# Altium PCB Watt.PcbDoc
Units mm, origin at the board's own origin, x right, y up, seen from the top; angles counter-clockwise.
Board outline 110 x 115 mm, 2 copper layers (Top Layer, Bottom Layer); 45 components, 38 nets, 166 pads, 9 vias.
Unrouted connection lines stored in the file: 27.
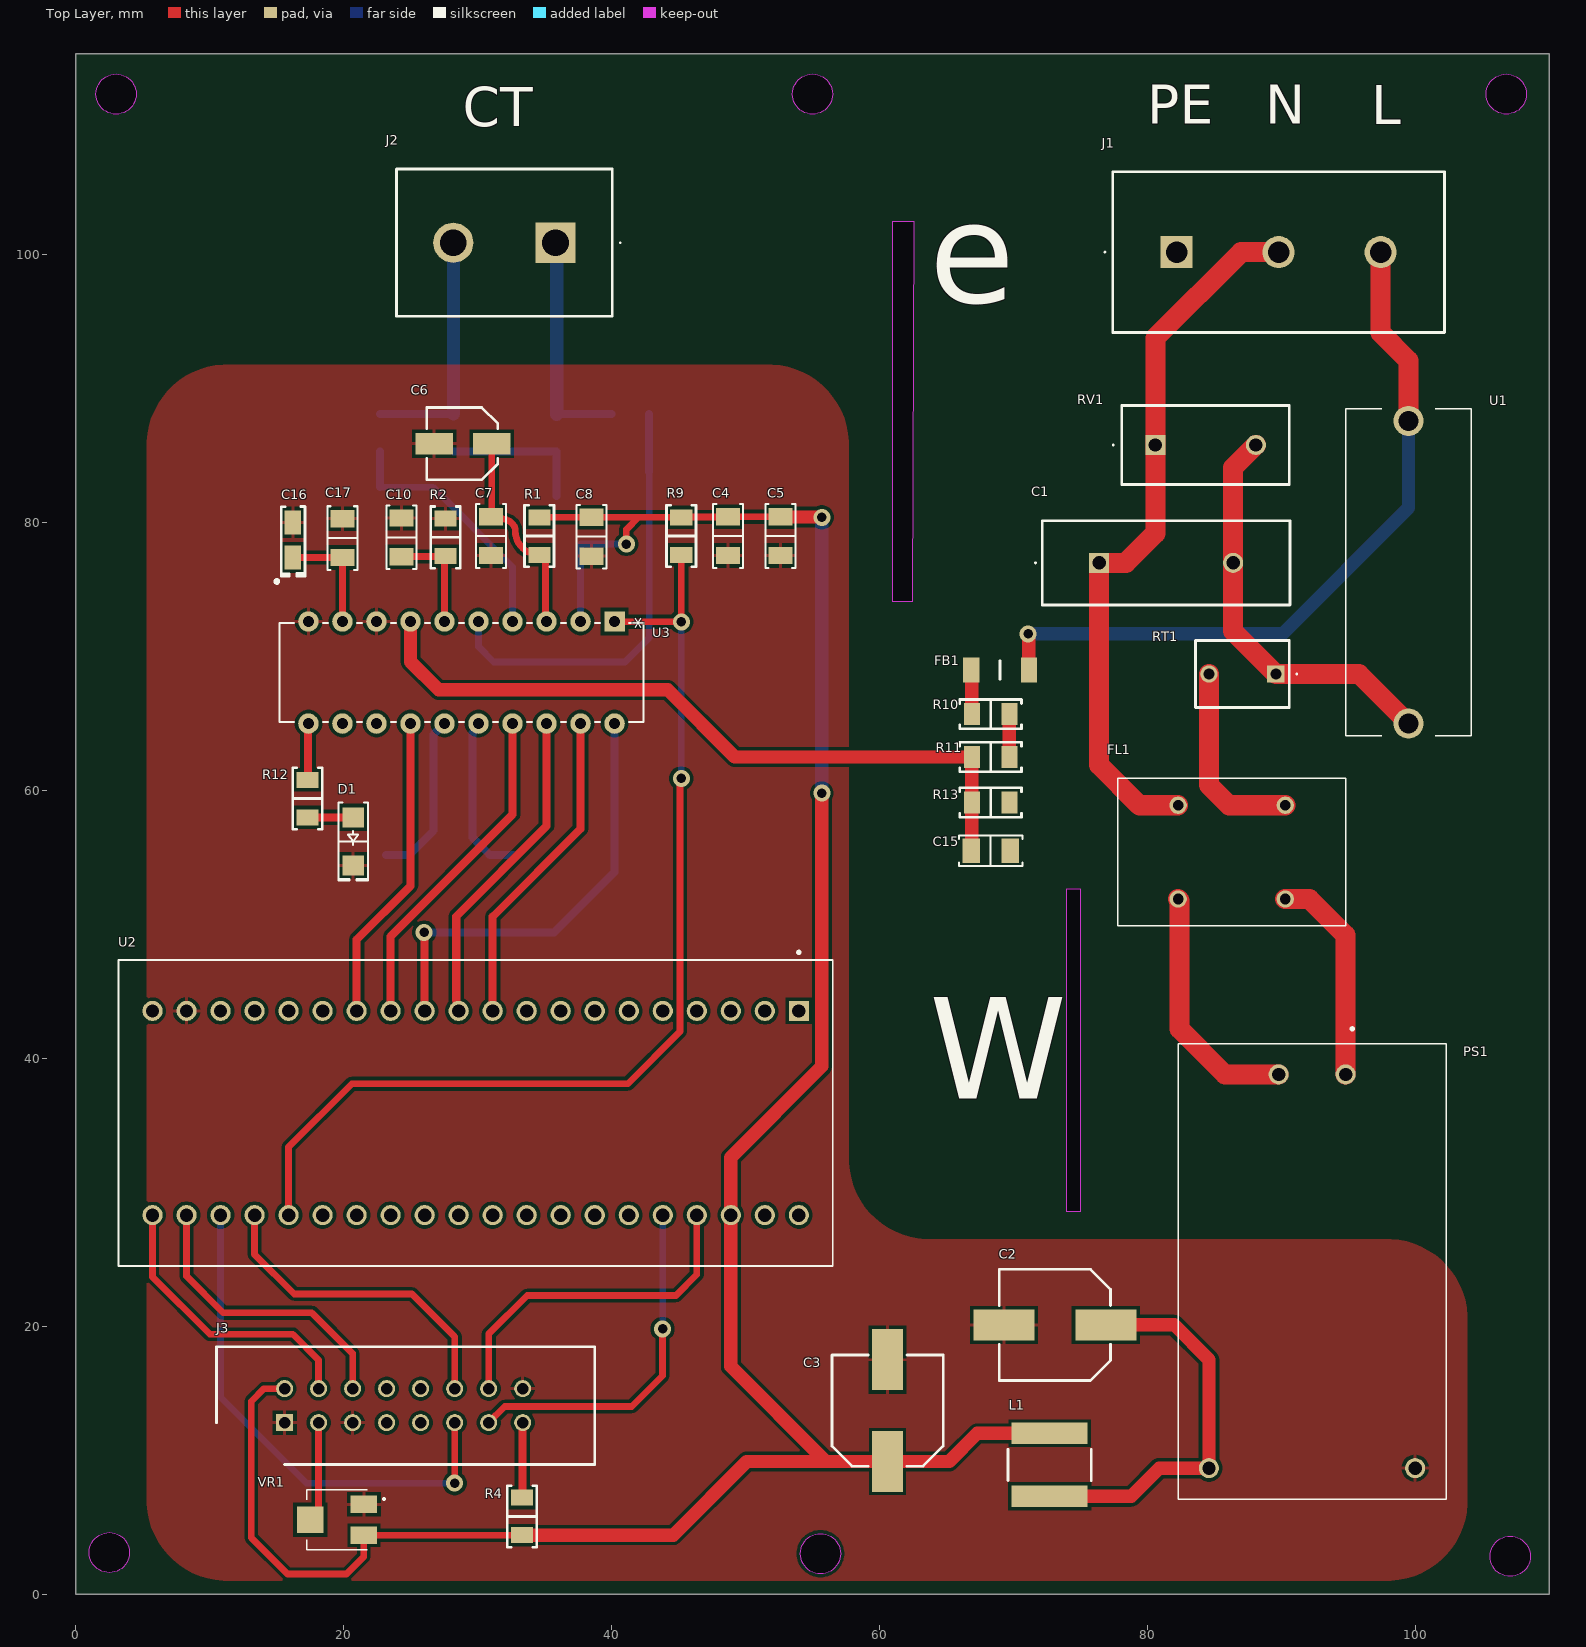
[diagram p0: Top Layer view]
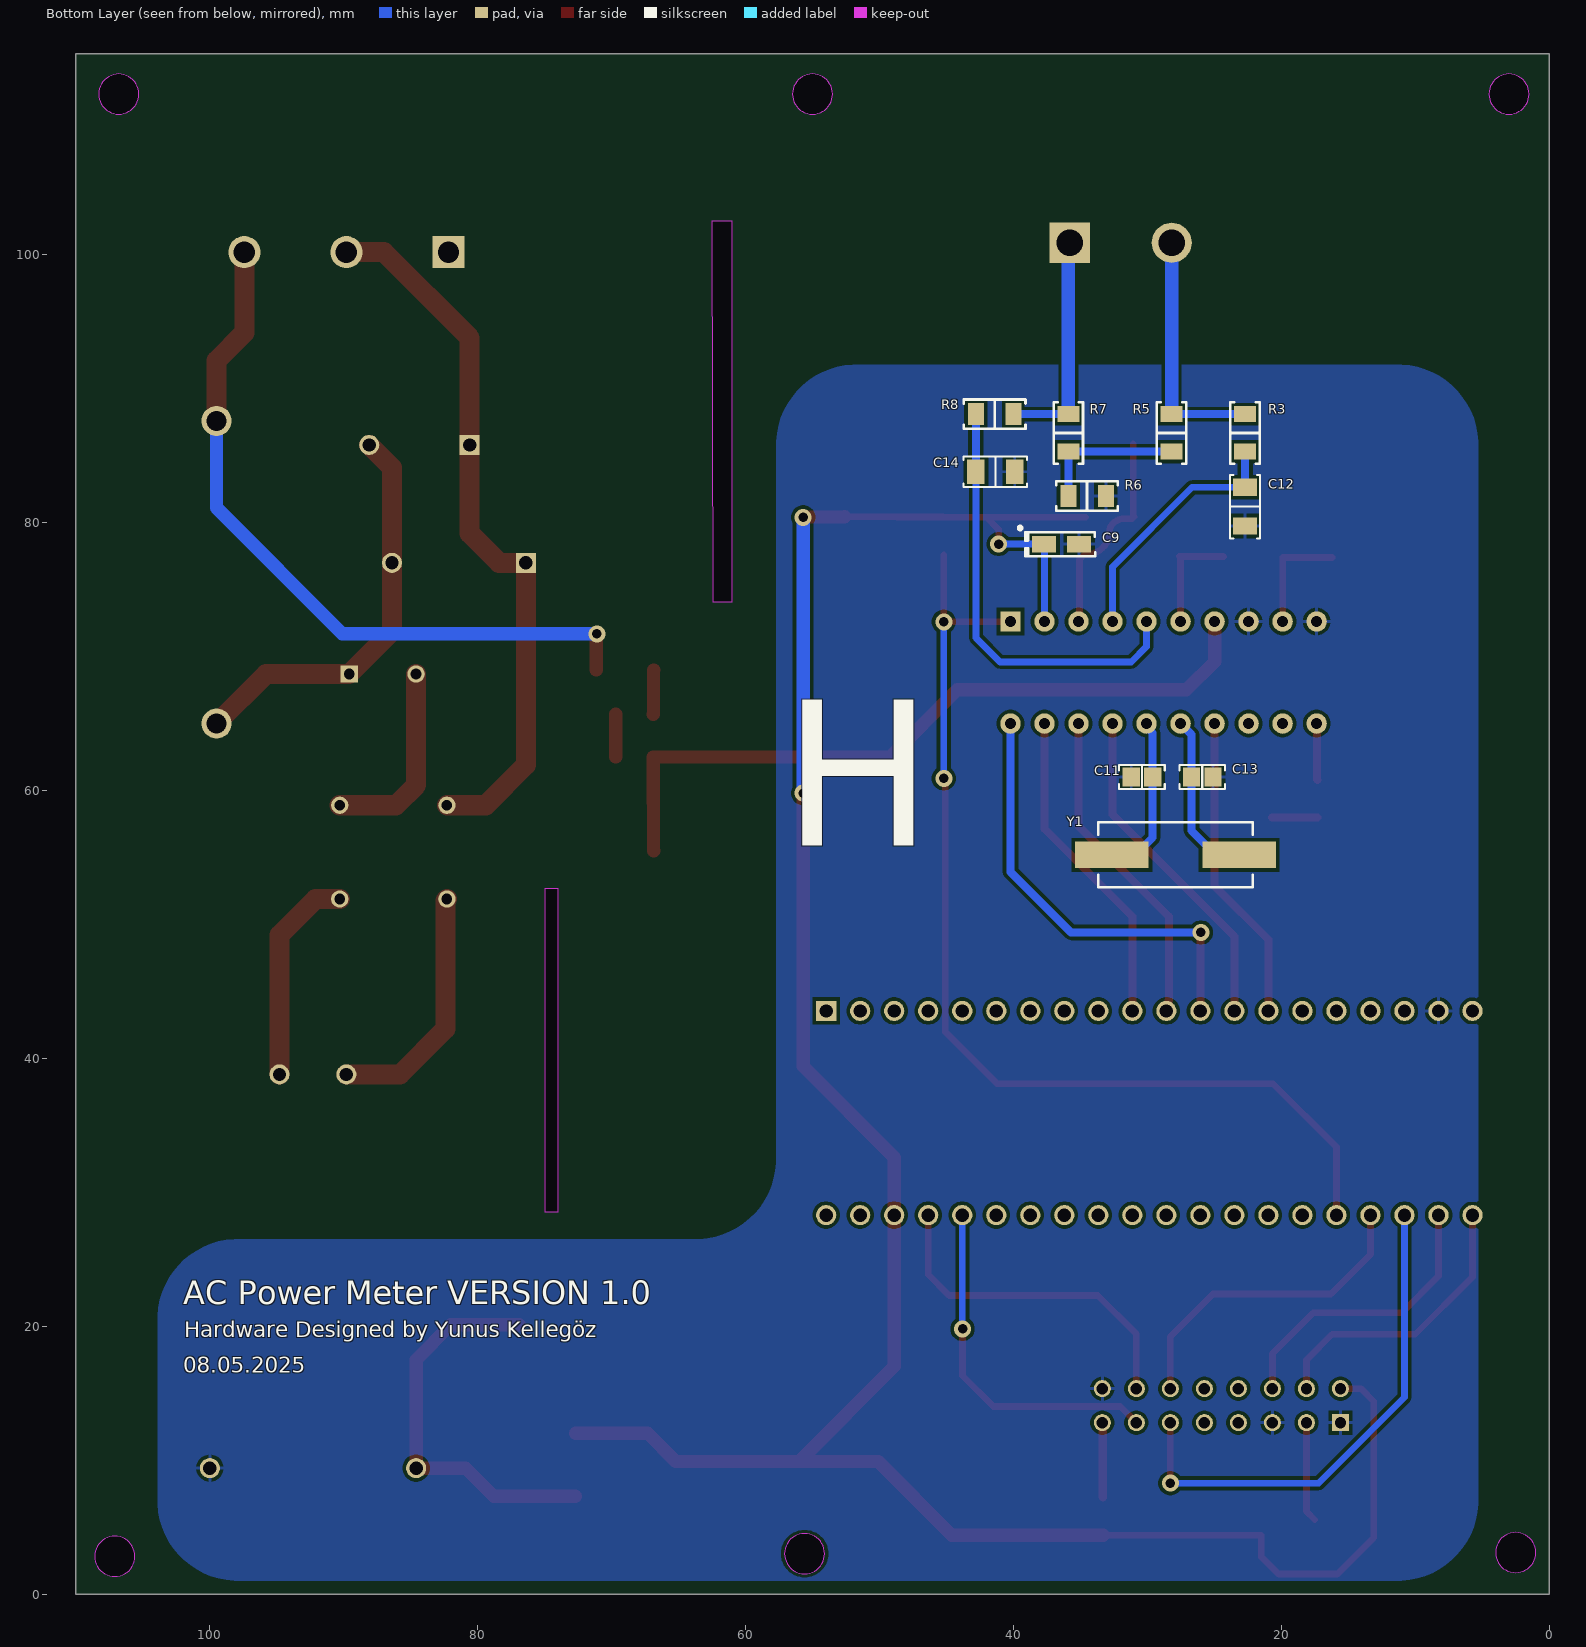
[diagram p1: Bottom Layer view, seen from below]
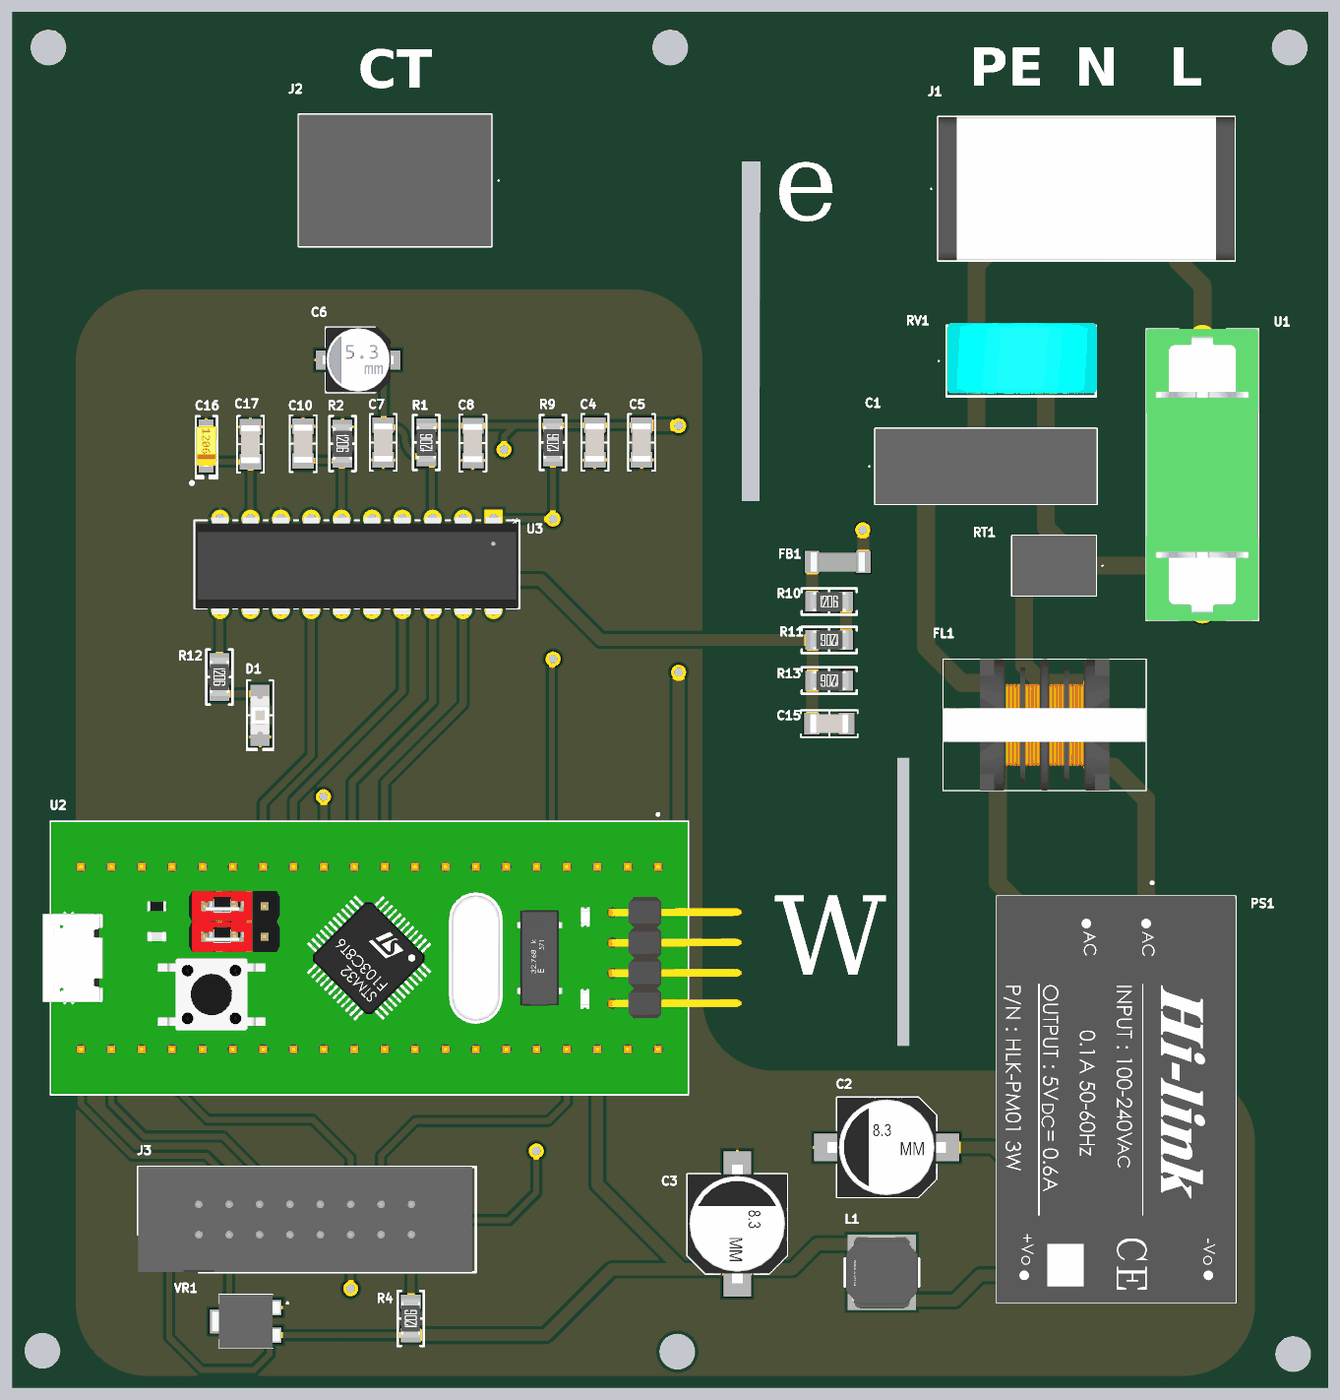
[diagram p2: 3D render of the assembled board from above, using the file's embedded part models]
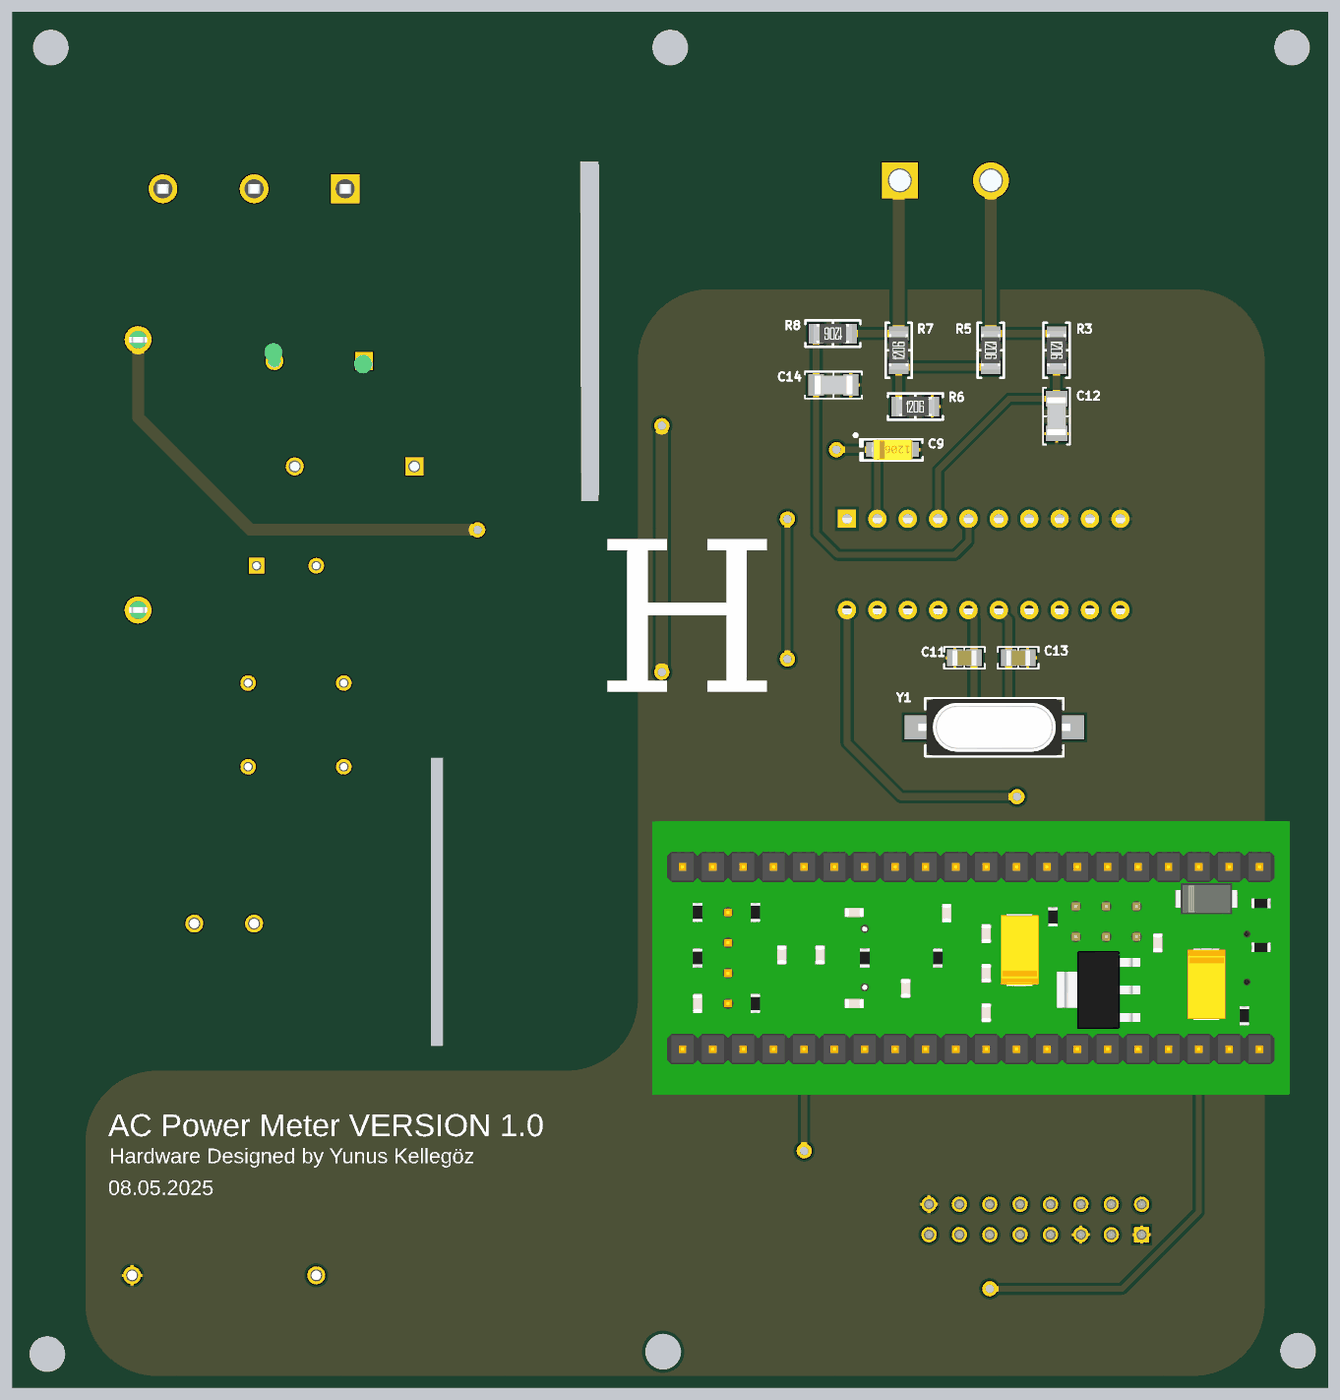
[diagram p3: 3D render of the assembled board from below, using the file's embedded part models]

## Layer stack, top to bottom
Top Solder: solder mask 0.0102, Solder Resist, Dk 3.5
Top Layer: signal copper 0.0356
Dielectric 1: dielectric 0.32, FR-4, Dk 4.8
Bottom Layer: signal copper 0.0356
Bottom Solder: solder mask 0.0102, Solder Resist, Dk 3.5

## Board outline
0,0 110,0 110,115 0,115
cut-out: 106.8,110.5 cw(c106.8,112) 105.3,112 cw(c106.8,112) 106.8,113.5 cw(c106.8,112) 108.3,112 cw(c106.8,112)
cut-out: 55,110.5 cw(c55,112) 53.5,112 cw(c55,112) 55,113.5 cw(c55,112) 56.5,112 cw(c55,112)
cut-out: 107.093,1.319 cw(c107.093,2.819) 105.593,2.819 cw(c107.093,2.819) 107.093,4.319 cw(c107.093,2.819) 108.593,2.819 cw(c107.093,2.819)
cut-out: 55.593,1.519 cw(c55.593,3.019) 54.093,3.019 cw(c55.593,3.019) 55.593,4.519 cw(c55.593,3.019) 57.093,3.019 cw(c55.593,3.019)
cut-out: 2.5,1.6 cw(c2.5,3.1) 1,3.1 cw(c2.5,3.1) 2.5,4.6 cw(c2.5,3.1) 4,3.1 cw(c2.5,3.1)
cut-out: 3,110.5 cw(c3,112) 1.5,112 cw(c3,112) 3,113.5 cw(c3,112) 4.5,112 cw(c3,112)
cut-out: 74,52.65 75,52.65 75,28.55 74,28.55
cut-out: 62.46,74.1 61,74.1 61,102.5 62.54,102.5

## Design rules (kind name [scope] priority, off if disabled: settings)
Clearance [All] p1: gap=0.254 ignorepadtopadclearanceinfootprint=FALSE except(0: Arc-Hole Track-Hole SMDPad-Hole THPad-Hole Via-Hole Fill-Hole Poly-Hole Region-Hole Text-Hole)
HoleSize [All] p1: absolutevalues=TRUE maxlimit=2.54 minlimit=0.2 maxpercent=80.000 minpercent=20.000
PolygonConnect [All] p1: connectstyle=Relief reliefconductorwidth=0.254 reliefentries=4 polygonreliefangle="90 Angle" airgapwidth=0.254
RoutingVias [All] p1: holewidth=0.711 width=1.27 viastyle="Through Hole" minholewidth=0.3 minwidth=0.6 maxholewidth=0.711 maxwidth=1.27
SolderMaskExpansion [All] p1: expansion=0.102 istentingtop=FALSE
Width [All] p1: maxlimit=2 minlimit=0.5 preferedwidth=1 minimp=50.000000 maximp=50.000000 favimp=50.000000
29 further rules are at their usual default settings.

## Components (designator, comment, footprint, x,y, rotation, side; value= is the part's Value field where it differs from the comment)
C1 "100nF 630V" ECQE6104KF3 76.4,77 r0 top
C2 "470 uF-6.3V" "CAP ALSMD 8.3MM H10.5MM" 73.1,20.1 r180 top value="470 µF"
C3 "470 uF-6.3V" "CAP ALSMD 8.3MM H10.5MM" 60.6,13.7 r90 top value="470 µF"
C4 "0.1 µF" "CAP 1206_3216 - 0.8MM" 48.7,79 r90 top
C5 "1µF" "CAP 1206_3216 - 1.0MM" 52.6,79 r90 top
C6 "220 µF" "CAP ALSMD POLY 5.3MM H6.0MM" 28.9,85.9 r180 top
C7 "0.1 µF" "CAP 1206_3216 - 0.8MM" 31,79 r90 top
C8 "0.1 µF" "CAP 1206_3216 - 0.8MM" 38.5,78.95 r90 top
C9 "10µF" "CAP POL 1206_3216" 36.4,78.4 r180 bottom
C10 "0.033 µF" "CAP 1206_3216 - 0.8MM" 24.3,78.9 r270 top
C11 "22 pF" "CAP 0805_2012" 30.4,61 r0 bottom
C12 "0.033 µF" "CAP 1206_3216 - 0.8MM" 22.7,81.2 r90 bottom
C13 "22 pF" "CAP 0805_2012" 25.9,61 r180 bottom
C14 "0.033 µF" "CAP 1206_3216 - 0.8MM" 41.35,83.8 r0 bottom
C15 "0.033 µF" "CAP 1206_3216 - 0.8MM" 68.3,55.5 r180 top
C16 "10µF" "CAP POL 1206_3216" 16.2,78.71 r90 top
C17 "0.1 µF" "CAP 1206_3216 - 0.8MM" 19.9,78.85 r270 top
D1 "Red" "LED 1206_3216 RED" 20.7,56.2 r270 top
FB1 "150 Ohm Ferrite Bead" BEADC4516X185N 69,69 r180 top
FL1 "UU9.8V-103-10mH" SU9VF02100 90.3,58.9 r180 top
J1 "1x3 Klemens" YK3030323000G 82.18,100.2 r0 top
J2 "CT" YK3210203000G 35.8,100.9 r180 top
J3 "2X8 LCD" SHDR16W65P254_2X8_2794X880X900P 15.58,12.8 r0 top
L1 "22uH" FP-NR6028-MFG 72.7,9.65 r90 top
PS1 "HLK-PM01" HLKPM01 94.8,38.8 r270 top
R1 "10 Ohms" "RES 1206_3216" 34.6,79 r90 top
R2 "1 kOhms" "RES 1206_3216" 27.6,78.9 r270 top
R3 "1 kOhms" "RES 1206_3216" 22.7,86.7 r270 bottom
R4 "10 kOhms" "RES 1206_3216" 33.3,5.8 r90 top
R5 "2.2 Ohms" "RES 1206_3216" 28.2,86.7 r270 bottom
R6 "0 Ohms" "RES 1206_3216" 34.5,82 r180 bottom
R7 "2.2 Ohms" "RES 1206_3216" 35.9,86.7 r90 bottom
R8 "1 kOhms" "RES 1206_3216" 41.4,88.1 r0 bottom
R9 "10 kOhms" "RES 1206_3216" 45.2,79 r90 top
R10 "255 kOhms" "RES 1206_3216" 68.3,65.7 r0 top
R11 "255 kOhms" "RES 1206_3216" 68.3,62.5 r180 top
R12 "820 Ohms" "RES 1206_3216" 17.3,59.4 r270 top
R13 "1 kOhms" "RES 1206_3216" 68.3,59.1 r180 top
RT1 "NTC 10D-7 10R" MF72010D5 87.1,68.7 r180 top
RV1 "10D561K" MOV10D561KTR 80.6,85.8 r0 top
U1 "500mA Fuse" 0PTF0078P 99.5,76.3 r270 top
U2 "STM32F103C6T8" MODULE_ZC323000 29.85,35.92 r270 top
U3 "ADE7756AN" N_20_ADI 40.22,72.62 r270 top
VR1 "10K Pot" 3314J2102E 19.5,5.55 r90 top
Y1 "3.579545MHz" "TXC 9C" 27.9,55.2 r0 bottom

## Footprints (in the part's own frame and the unit in brackets; to place one, negate y for a bottom-side part, rotate by r counter-clockwise, add the part's x,y. Pads: shape width x height; smd on the part's side, far side on the other; paste and mask are expansions set on the pad)
0PTF0078P [mm]
  round 2.25 hole 1.5: 1(-11.3,0) 2(11.3,0)
  silkscreen extent -12.2,-4.7 12.2,4.7, body extent -12.2,-4.7 12.2,4.7, height 11.45
3314J2102E [mm]
  rect 1.3x2 smd: 1(1.15,-2) 3(-1.15,-2)
  rect 2x2 smd: 2(0,2)
  silkscreen extent -2.25,-3.55 2.25,2.25, body extent -2.25,-2.87 2.25,2.8, height 2.65
BEADC4516X185N [mm]
  rect 1.2x1.85 smd: 1(-2.15,0) 2(2.15,0)
  silkscreen extent 0,-0.7 0,0.7, body extent -2.25,-0.8 2.25,0.8, height 1.85
"CAP 0805_2012" [mm] "Chip Capacitor, 2-Leads, Body 2.00x1.20mm, IPC Medium Density"
  rect 1.3x1.4 smd: 1(-0.8,0) 2(0.8,0)
  silkscreen extent -1.7,-0.9 1.7,0.9, body extent -1,-0.64 1,0.64, height 1.26
"CAP 1206_3216 - 0.8MM" [mm] "Chip Capacitor, 2-Leads, Body 3.25x1.60mm, IPC Medium Density"
  rect 1.3x1.8 smd: 1(-1.45,0) 2(1.45,0)
  silkscreen extent -2.38,-1.12 2.37,1.12, body extent -1.6,-0.8 1.6,0.8, height 0.8
"CAP 1206_3216 - 1.0MM" [mm] "Chip Capacitor, 2-Leads, Body 3.25x1.60mm, IPC Medium Density"
  rect 1.3x1.8 smd: 1(-1.45,0) 2(1.45,0)
  silkscreen extent -2.38,-1.13 2.37,1.12, body extent -1.6,-0.8 1.6,0.8, height 1
"CAP ALSMD 8.3MM H10.5MM" [mm] "Aluminum Electrolytic Capacitor, Body 8.30x8.30x10.50mm, IPC Low Density"
  rect 4.55x2.3 smd: 1(-3.8,0) 2(3.8,0)
  silkscreen extent -4.15,-4.15 4.15,4.15, body extent -4.95,-4.15 4.95,4.15, height 10.5
"CAP ALSMD POLY 5.3MM H6.0MM" [mm] "Aluminum Polymer Capacitor, Body 5.30x5.30x6.0mm, IPC Medium Density"
  rect 2.8x1.6 smd: 1(-2.15,0) 2(2.15,0)
  silkscreen extent -2.6,-2.7 2.7,2.7, body extent -2.95,-2.7 2.95,2.7, height 6
"CAP POL 1206_3216" [mm] "Molded Capacitor, 2-Leads, Body 3.20x1.6mm, IPC Medium Density"
  rect 1.8x1.23 smd: 1(-1.31,0) 2(1.31,0)
  silkscreen extent -3.22,-0.9 2.5,1.32, body extent -1.72,-0.85 1.71,0.85, height 1.7
ECQE6104KF3 [mm]
  rect 1.5x1.5 hole 1: 1(0,0)
  round 1.5 hole 1: 2(10,0)
  silkscreen extent -4.8,-3.15 14.25,3.15, body extent -4.25,-3.15 14.25,3.15, height 19.1
FP-NR6028-MFG [mm]
  rect 1.6x5.7 smd paste+0 mask+0: 1(-2.35,0) 2(2.35,0)
  silkscreen extent -1.18,-3.1 1.17,3.1, body extent -3.25,-3.2 3.25,3.2, height 0.25
HLKPM01 [mm]
  round 1.5 hole 1: 1(0,0) 2(0,-5) 3(29.4,5.2) 4(29.4,-10.2)
  silkscreen extent -3.5,-12.5 31.7,7.5, body extent -2.3,-12.5 31.7,7.5, height 15.05
"LED 1206_3216 RED" [mm] "Chip Diode, 2-Leads, Body 3.13x1.55mm, IPC Medium Density"
  rect 1.5x1.6 smd: 1(-1.8,0) 2(1.8,0)
  silkscreen extent -2.92,-1.1 2.92,1.1, body extent -1.6,-0.8 1.6,0.8, height 0.9
MF72010D5 [mm]
  rect 1.3x1.3 hole 0.8: 1(-2.5,0)
  round 1.3 hole 0.8: 2(2.5,0)
  silkscreen extent -4.1,-2.5 3.5,2.5, body extent -3.5,-2.5 3.5,2.5, height 11.1
MODULE_ZC323000 [mil]
  rect 59.37x59.37 hole 39.37: 1(-300,950)
  round 59.37 hole 39.37: 2(-300,850) 3(-300,750) 4(-300,650) 5(-300,550) 6(-300,450) 7(-300,350) 8(-300,250) 9(-300,150) 10(-300,50) 11(-300,-50) 12(-300,-150) 13(-300,-250) 14(-300,-350) 15(-300,-450) 16(-300,-550) 17(-300,-650) 18(-300,-750) 19(-300,-850) 20(-300,-950) 21(300,-950) 22(300,-850) 23(300,-750) 24(300,-650) 25(300,-550) 26(300,-450) 27(300,-350) 28(300,-250) 29(300,-150) 30(300,-50) 31(300,50) 32(300,150) 33(300,250) 34(300,350) 35(300,450) 36(300,550) 37(300,650) 38(300,750) 39(300,850) 40(300,950)
  silkscreen extent -476,-1050 450,1050, body extent -450,-1075 450,1225, height 354
MOV10D561KTR [mm]
  rect 1.5x1.5 hole 1: 1(0,0)
  round 1.5 hole 1: 2(7.5,0)
  silkscreen extent -3.2,-2.95 10,2.95, body extent -2.42,-2.71 10.08,3.19, height 13.71
N_20_ADI [mil]
  rect 60x60 / inner round 60 / far side rect 60x60 hole 32 paste-30 mask+0: 1(0,0)
  round 60 hole 32 paste-30 mask+0: 2(0,-100) 3(0,-200) 4(0,-300) 5(0,-400) 6(0,-500) 7(0,-600) 8(0,-700) 9(0,-800) 10(0,-900) 11(300,-900) 12(300,-800) 13(300,-700) 14(300,-600) 15(300,-500) 16(300,-400) 17(300,-300) 18(300,-200) 19(300,-100) 20(300,0)
  silkscreen extent 5,-985 295,85, body extent -5,-980 315,80, height 215
"RES 1206_3216" [mm] "Chip Resistor, 2-Leads, Body 3.13x1.55mm, IPC Medium Density"
  rect 1.2x1.65 smd: 1(-1.4,0) 2(1.4,0)
  silkscreen extent -2.3,-1.1 2.3,1.1, body extent -1.6,-0.8 1.6,0.8, height 0.6
SHDR16W65P254_2X8_2794X880X900P [mm]
  rect 1.275x1.275 hole 0.85: 1(0,0)
  round 1.275 hole 0.85: 2(0,2.54) 3(2.54,0) 4(2.54,2.54) 5(5.08,0) 6(5.08,2.54) 7(7.62,0) 8(7.62,2.54) 9(10.16,0) 10(10.16,2.54) 11(12.7,0) 12(12.7,2.54) 13(15.24,0) 14(15.24,2.54) 15(17.78,0) 16(17.78,2.54)
  silkscreen extent -5.08,-3.13 23.16,5.67, body extent -5.08,-3.13 22.86,5.67, height 9
SU9VF02100 [mm]
  round 1.3 hole 0.8: 1(0,0) 2(8,0) 3(8,7) 4(0,7)
  silkscreen extent -4.5,-2 12.5,9, body extent -4.5,-2 12.5,9, height 16.91
"TXC 9C" [mm] "Crystal, 2-Leads, Body 4.70x11.40mm, Pitch 8.80mm, IPC Medium Density"
  rect 5.5x2 smd: 1(-4.75,0) 2(4.75,0)
  silkscreen extent -5.77,-2.42 5.78,2.42, body extent -6.35,-2.35 6.35,2.35, height 4.2
YK3030323000G [mm]
  rect 2.4x2.4 hole 1.6: 1(0,0)
  round 2.4 hole 1.6: 2(7.62,0) 3(15.24,0)
  silkscreen extent -5.4,-6 20.01,6, body extent -4.77,-6 20.01,6, height 16.28
YK3210203000G [mm]
  rect 3x3 hole 2: 1(0,0)
  round 3 hole 2: 2(7.62,0)
  silkscreen extent -4.9,-5.5 11.86,5.5, body extent -4.24,-5.5 11.86,5.5, height 16

## Part data
C1: library part ECQ-E6104KF3, "Capacitor", Manufacturer_Name=Panasonic, Mouser Part Number=667-ECQ-E6104KF3, Datasheet Link=https://industrial.panasonic.com/ww/products/pt/film-cap-electroequip/models/ECQE6104JFW, Height=19mm, Manufacturer_Part_Number=ECQ-E6104KF3, Mouser Price/Stock=https://www.mouser.co.uk/ProductDetail/Panasonic/ECQ-E6104KF3?qs=9ouE0kzBZ2ok8zr8PFf9Hw%3D%3D
C2 C3: library part 10SKV470M8X10.5, "CAP ALUM 470UF 20% 10V SMD", Capacitance="470 µF", Device Package="Radial, Can - SMD", Lifetime @ Temp.="1000 Hrs @ 105°C", Manufacturer=Rubycon, Operating Temperature="-55°C ~ 105°C", Ripple Current @ High Frequency="252 mA @ 10 kHz", Ripple Current @ Low Frequency="210 mA @ 120 Hz", Supplier Part Number 1=1189-3067-1-ND, Tolerance=±20%, Voltage - Rated="10 V", Applications="General Purpose", ComponentLink1Description=Datasheet, ComponentLink1URL=http://www.rubycon.co.jp/en/catalog/e_pdfs/aluminum/e_SKV.pdf, ComponentLink2Description="DigiKey Link", ComponentLink2URL=https://www.digikey.com/en/products/detail/rubycon/10SKV470M8X10-5/3568721, Height - Seated (Max)="0.413\" (10.50mm)", lastupdated="3.06.2024 20:15:49", Lifecycle Status=Active, Minimum Order=1, Mounting Type="Surface Mount", Package / Case="Radial, Can - SMD", Packaging=TapeAndReel, Part Number=10SKV470M8X10.5, Part Status=Active, partid=7459, Polarization=Polar, price=0.18, Series=SKV, Size / Dimension="0.315\" Dia (8.00mm)", Supplier 1=DigiKey, Surface Mount Land Size="0.327\" L x 0.327\" W (8.30mm x 8.30mm)"
C4 C7 C8 C17: library part CC1206MRY5V9BB104, "CAP CER 0.1UF 50V Y5V 1206", Capacitance=100nF, Device Package="1206 (3216 Metric)", Manufacturer=Yageo, Operating Temperature="-30°C ~ 85°C", Supplier Part Number 1=311-4504-1-ND, Temperature Coefficient="Y5V (F)", Tolerance=±20%, Voltage - Rated=50V, Applications="General Purpose", ComponentLink1Description=Datasheet, ComponentLink1URL=http://www.yageo.com/documents/recent/UPY-GPHC_Y5V_6.3V-to-50V_8.pdf, ComponentLink2Description="DigiKey Link", ComponentLink2URL=https://www.digikey.com/en/products/detail/yageo/CC1206MRY5V9BB104/5884674, lastupdated="4.06.2024 19:10:39", Lifecycle Status=Active, Minimum Order=1, Mounting Type="Surface Mount, MLCC", Package / Case="1206 (3216 Metric)", Packaging=TapeAndReel, Part Number=CC1206MRY5V9BB104, Part Status=Active, partid=18711, price=0.04, Series=CC, Size / Dimension="0.126\" L x 0.063\" W (3.20mm x 1.60mm)", Supplier 1=DigiKey, Thickness (Max)="0.028\" (0.70mm)"
C5: library part 12065C105K4Z2A, "CAP CER 1UF 50V X7R 1206", Device Package="1206 (3216 Metric)", Manufacturer="AVX Corporation", Operating Temperature="-55°C ~ 125°C", Ratings=AEC-Q200, Supplier Part Number 1=478-10886-1-ND, Temperature Coefficient=X7R, Tolerance=±10%, Voltage - Rated=50V, Applications="Automotive, Boardflex Sensitive", Capacitance=1µF, ComponentLink1Description=Datasheet, ComponentLink1URL=http://datasheets.avx.com/AutoMLCC.pdf, ComponentLink2Description="DigiKey Link", ComponentLink2URL=http://digikey.com/product-detail/en/avx-corporation/12065C105K4Z2A/478-10886-1-ND/7536455, Features="Soft Termination", lastupdated="2.09.2020 01:05:06", Lifecycle Status=Active, Minimum Order=1, Mounting Type="Surface Mount, MLCC", Package / Case="1206 (3216 Metric)", Packaging=TapeAndReel, Part Number=12065C105K4Z2A, Part Status=Active, partid=18944, price=0.12, Series=FLEXITERM®, Size / Dimension="0.126\" L x 0.063\" W (3.20mm x 1.60mm)", Supplier 1=DigiKey, Thickness (Max)="0.037\" (0.94mm)"
C6: library part 6SVPE220MW, "CAP ALUM POLY 220UF 20% 6.3V SMD", Device Package="Radial, Can - SMD", ESR (Equivalent Series Resistance)=15mOhm, Lifetime @ Temp.="2000 Hrs @ 105°C", Manufacturer="Panasonic Electronic Components", Operating Temperature="-55°C ~ 105°C", Ripple Current @ High Frequency="3.15 A @ 100 kHz", Ripple Current @ Low Frequency="157.5 mA @ 120 Hz", Supplier Part Number 1=P16836CT-ND, Tolerance=±20%, Voltage - Rated="6.3 V", Applications="General Purpose", Capacitance="220 µF", ComponentLink1Description=Datasheet, ComponentLink1URL=http://industrial.panasonic.com/www-cgi/jvcr13pz.cgi?E+CI+4+AAB8002+6SVPE220MW+8+WW, ComponentLink2Description="DigiKey Link", ComponentLink2URL=https://www.digikey.com/en/products/detail/panasonic-electronic-components/6SVPE220MW/4209271, Height - Seated (Max)="0.236\" (6.00mm)", lastupdated="3.06.2024 20:02:32", Lifecycle Status=Active, Minimum Order=1, Mounting Type="Surface Mount", Package / Case="Radial, Can - SMD", Packaging=TapeAndReel, Part Number=6SVPE220MW, Part Status=Active, partid=1960, price=0.30, Series="OS-CON™, SVPE", Size / Dimension="0.197\" Dia (5.00mm)", Supplier 1=DigiKey, Surface Mount Land Size="0.209\" L x 0.209\" W (5.30mm x 5.30mm)", Type=Polymer
C9 C16: library part THJA106K006RJN, "CAP TANT 10UF 10% 6.3V 1206", Device Package="1206 (3216 Metric)", ESR (Equivalent Series Resistance)=2.2Ohm, Manufacturer="AVX Corporation", Manufacturer Size Code=A, Operating Temperature="-55°C ~ 175°C", Supplier Part Number 1=478-7574-1-ND, Tolerance=±10%, Voltage - Rated=6.3V, Capacitance=10µF, ComponentLink1Description=Datasheet, ComponentLink1URL=http://datasheets.avx.com/THJ.pdf, ComponentLink2Description="DigiKey Link", ComponentLink2URL=http://digikey.com/product-detail/en/avx-corporation/THJA106K006RJN/478-7574-1-ND/3660378, Features="General Purpose", Height - Seated (Max)="0.063\" (1.60mm)", lastupdated="2.09.2020 01:15:59", Lifecycle Status=Active, Minimum Order=1, Mounting Type="Surface Mount", Package / Case="1206 (3216 Metric)", Packaging=TapeAndReel, Part Number=THJA106K006RJN, Part Status=Active, partid=220, price=0.16, Series=THJ, Size / Dimension="0.126\" L x 0.063\" W (3.20mm x 1.60mm)", Supplier 1=DigiKey, Type=Molded
C10 C12 C14 C15: library part C1206F333K5RAC7800, "CAP CER 0.033UF 50V X7R 1206", Capacitance="33 nF", Device Package="1206 (3216 Metric)", Manufacturer=KEMET, Operating Temperature="-55°C ~ 125°C", Supplier Part Number 1=399-20241-1-ND, Temperature Coefficient=X7R, Tolerance=±10%, Voltage - Rated=50V, Applications="General Purpose", ComponentLink1Description=Datasheet, ComponentLink1URL=https://api.kemet.com/component-edge/download/datasheet/C1206F333K5RAC7800.pdf, ComponentLink2Description="DigiKey Link", ComponentLink2URL=https://www.digikey.com/en/products/detail/kemet/C1206F333K5RAC7800/9925533, Features="Open Mode", lastupdated="4.06.2024 19:10:40", Lifecycle Status=Active, Minimum Order=1, Mounting Type="Surface Mount, MLCC", Package / Case="1206 (3216 Metric)", Packaging=TapeAndReel, Part Number=C1206F333K5RAC7800, Part Status=Active, partid=18898, price=0.17, Series="SMD Comm X7R FO", Size / Dimension="0.126\" L x 0.063\" W (3.20mm x 1.60mm)", Supplier 1=DigiKey, Thickness (Max)="0.043\" (1.10mm)"
C11 C13: library part C0805C220J5GACAUTO, "CAP CER 22PF 50V C0G/NP0 0805", Device Package="0805 (2012 Metric)", Manufacturer=KEMET, Operating Temperature="-55°C ~ 125°C", Ratings=AEC-Q200, Supplier Part Number 1=399-6937-1-ND, Temperature Coefficient="C0G, NP0", Tolerance=±5%, Voltage - Rated=50V, Applications=Automotive, Capacitance="22 pF", ComponentLink1Description=Datasheet, ComponentLink1URL=https://api.kemet.com/component-edge/download/datasheet/C0805C220J5GACAUTO.pdf, ComponentLink2Description="DigiKey Link", ComponentLink2URL=https://www.digikey.com/en/products/detail/kemet/C0805C220J5GACAUTO/3314930, Features="Low ESL", lastupdated="9.02.2024 20:16:09", Lifecycle Status=Active, Minimum Order=1, Mounting Type="Surface Mount, MLCC", Package / Case="0805 (2012 Metric)", Packaging=TapeAndReel, Part Number=C0805C220J5GACAUTO, Part Status=Active, partid=2537, price=0.01, Series="SMD Auto C0G", Size / Dimension="0.079\" L x 0.049\" W (2.00mm x 1.25mm)", Supplier 1=DigiKey, Thickness (Max)="0.035\" (0.88mm)"
D1: library part CMD11-21VRC/TR8, "LED RED CLEAR 1206 SMD", Current - Test=20mA, Device Package="1206 (3216 Metric)", Lens Color=1.50mm, Manufacturer="Visual Communications Company - VCC", Millicandela Rating=6mcd, Supplier Device Package=1206, Supplier Part Number 1=L62001CT-ND, Voltage - Forward (Vf) (Typ)=2V, Color=Red, ComponentLink1Description=Datasheet, ComponentLink1URL=https://vcclite.com/wp-content/uploads/wpallimport/files/files/CMD11-21%20SMT%20LEDs%201206%20Package%20Size.pdf, ComponentLink2Description="DigiKey Link", ComponentLink2URL=https://www.digikey.com/en/products/detail/visual-communications-company-vcc/CMD11-21VRC-TR8/254829, Configuration=Standard, Height (Max)=1.50mm, lastupdated="3.06.2024 20:00:41", Lens Size="1.10mm Dia", Lens Style="Round with Flat Top", Lens Transparency=Clear, Lifecycle Status=Active, Minimum Order=1, Mounting Type="Surface Mount", Package / Case="1206 (3216 Metric)", Packaging=TapeAndReel, Part Number=CMD11-21VRC/TR8, Part Status=Active, partid=184, price=0.24, Series=-, Size / Dimension="3.00mm L x 1.50mm W", Supplier 1=DigiKey, Viewing Angle=20°, Wavelength - Peak=640nm
FB1: library part LI1806C151R-10, "Ferrite Bead", Manufacturer_Name="Laird-Signal Integrity Products", Datasheet Link=https://assets.lairdtech.com/home/brandworld/files/LI1806C151R-10.pdf, Height=1.85mm, Manufacturer_Part_Number=LI1806C151R-10
FL1: library part SU9VF-02100, "Filter", Manufacturer_Name=KEMET, Mouser Part Number=80-SU9VF-02100, Arrow Part Number=SU9VF-02100, Arrow Price/Stock=https://www.arrow.com/en/products/su9vf-02100/kemet-corporation?region=nac, Datasheet Link=https://content.kemet.com/datasheets/KEM_LF0017_SU9VF-9HF.pdf, Height=17mm, Manufacturer_Part_Number=SU9VF-02100, Mouser Price/Stock=https://www.mouser.co.uk/ProductDetail/KEMET/SU9VF-02100?qs=BenOyfdfArr5wEjIaShULA%3D%3D
J1: library part YK3030323000G, "Connector", Manufacturer_Name=Amphenol, Mouser Part Number=649-YK30303230J0G, Datasheet Link=http://www.anytek.com.tw/UserUpFiles/20121222/mLK3Fon9ty0A.pdf, Height=15.6mm, Manufacturer_Part_Number=YK3030323000G, Mouser Price/Stock=https://www.mouser.co.uk/ProductDetail/Amphenol-Anytek/YK3030323000G?qs=Mv7BduZupUh63LOTVB5zVA%3D%3D
J2: library part YK3210203000G, "Connector", Manufacturer_Name=Amphenol, Mouser Part Number=649-YK32102030J0G, Datasheet Link=https://eu.mouser.com/datasheet/2/18/7Pva_Bm2hlSl-1379478.pdf, Height=15.9mm, Manufacturer_Part_Number=YK3210203000G, Mouser Price/Stock=https://www.mouser.co.uk/ProductDetail/Amphenol-Anytek/YK3210203000G?qs=Mv7BduZupUi0q03DSkdXZw%3D%3D
J3: library part 3020-16-0100-00, "Connector", Manufacturer_Name="CNC Tech", Arrow Part Number=3020-16-0100-00, Arrow Price/Stock=https://www.arrow.com/en/products/3020-16-0100-00/cnc-tech-llc?region=nac, Datasheet Link=http://cnctech.us/pdfs/3020-XX-0100-00.pdf, Height=9mm, Manufacturer_Part_Number=3020-16-0100-00
L1: library part CMP-14484-000420-1, "SMD Power Inductors 22uH ±20% 1.3A 0.1755Ω", Case/Package=2424, Current Rating=1.4A, DC Resistance (DCR)=175.5mR, Max Operating Temperature=120°C, Min Operating Temperature=-25°C, Package Quantity=2000, Resistor Type=Wirewound, Saturation Current=1.3A, Self Resonant Frequency=12MHz, Test Frequency=100kHz, Tolerance=20%, Core Material=Ferrite, Halogen Free="Halogen Free", Height=2.8mm, Height - Seated (Max)=0.11inch, Length=0.236inch, Max DC Current=1.4A, Mount="Surface Mount", Number of Pins=2, Packaging="Tape and Reel", RMS Current (Irms)=1.4A, RoHS Compliant=Yes, Series=NR, Shielding=Shielded, Termination=SMD/SMT, Width=6mm, Inductance=22uH, Inductance Tolerance=20%
PS1: "Power Supply", Manufacturer_Name=Hi-Link, Datasheet Link=https://datasheet.lcsc.com/szlcsc/1906201102_HI-LINK-HLK-PM03_C209904.pdf, Height=15mm, Manufacturer_Part_Number=HLK-PM01
R1: library part RNCS1206BKE10R0, "RES 10 OHM 0.1% 1/8W 1206", Device Package="1206 (3216 Metric)", Manufacturer="Stackpole Electronics Inc", Operating Temperature="-55°C ~ 155°C", Power (Watts)="0.125W, 1/8W", Ratings=AEC-Q200, Supplier Device Package=1206, Supplier Part Number 1=RNCS1206BKE10R0CT-ND, Temperature Coefficient=±25ppm/°C, Tolerance=±0.1%, ComponentLink1Description=Datasheet, ComponentLink1URL=https://www.seielect.com/catalog/sei-rncs_rnch.pdf, ComponentLink2Description="DigiKey Link", ComponentLink2URL=https://www.digikey.com/en/products/detail/stackpole-electronics-inc/RNCS1206BKE10R0/1801459, Composition="Thin Film", Features="Anti-Corrosive, Automotive AEC-Q200, Moisture Resistant", Height - Seated (Max)="0.026\" (0.65mm)", lastupdated="9.02.2024 20:54:46", Lifecycle Status=Active, Minimum Order=1, Number of Terminations=2, Package / Case="1206 (3216 Metric)", Packaging=TapeAndReel, Part Number=RNCS1206BKE10R0, Part Status=Active, partid=26855, price=0.08, Resistance="10 Ohms", Series=RNCS, Size / Dimension="0.120\" L x 0.061\" W (3.05mm x 1.55mm)", Supplier 1=DigiKey
R2 R3 R8 R13: library part RNCS1206BKE1K00, "RES 1K OHM 0.1% 1/8W 1206", Device Package="1206 (3216 Metric)", Manufacturer="Stackpole Electronics Inc", Operating Temperature="-55°C ~ 155°C", Power (Watts)="0.125W, 1/8W", Ratings=AEC-Q200, Supplier Device Package=1206, Supplier Part Number 1=RNCS1206BKE1K00CT-ND, Temperature Coefficient=±25ppm/°C, Tolerance=±0.1%, ComponentLink1Description=Datasheet, ComponentLink1URL=https://www.seielect.com/catalog/sei-rncs_rnch.pdf, ComponentLink2Description="DigiKey Link", ComponentLink2URL=https://www.digikey.com/en/products/detail/stackpole-electronics-inc/RNCS1206BKE1K00/1800333, Composition="Thin Film", Features="Anti-Corrosive, Automotive AEC-Q200, Moisture Resistant", Height - Seated (Max)="0.026\" (0.65mm)", lastupdated="9.02.2024 20:54:46", Lifecycle Status=Active, Minimum Order=1, Number of Terminations=2, Package / Case="1206 (3216 Metric)", Packaging=TapeAndReel, Part Number=RNCS1206BKE1K00, Part Status=Active, partid=26856, price=0.08, Resistance="1 kOhms", Series=RNCS, Size / Dimension="0.120\" L x 0.061\" W (3.05mm x 1.55mm)", Supplier 1=DigiKey
R4 R9: library part CRGCQ1206F10K, "RES 10K OHM 1% 1/4W 1206", Device Package="1206 (3216 Metric)", Manufacturer="TE Connectivity Passive Product", Operating Temperature="-55°C ~ 155°C", Power (Watts)="0.25W, 1/4W", Ratings=AEC-Q200, Supplier Device Package=1206, Supplier Part Number 1=A129822CT-ND, Temperature Coefficient=±100ppm/°C, Tolerance=±1%, ComponentLink1Description=Datasheet, ComponentLink1URL=https://www.te.com/commerce/DocumentDelivery/DDEController?Action=srchrtrv&DocNm=1773204-3&DocType=DS&DocLang=English, ComponentLink2Description="DigiKey Link", ComponentLink2URL=https://www.digikey.com/en/products/detail/te-connectivity-passive-product/CRGCQ1206F10K/8576424, Composition="Thick Film", Features="Automotive AEC-Q200, Moisture Resistant", Height - Seated (Max)="0.026\" (0.65mm)", lastupdated="9.02.2024 20:54:44", Lifecycle Status=Active, Minimum Order=1, Number of Terminations=2, Package / Case="1206 (3216 Metric)", Packaging=TapeAndReel, Part Number=CRGCQ1206F10K, Part Status=Active, partid=27005, price=0.01, Resistance="10 kOhms", Series=CRGCQ, Size / Dimension="0.122\" L x 0.061\" W (3.10mm x 1.55mm)", Supplier 1=DigiKey
R5 R7: library part RMCF1206FT2R20, "RES 2.2 OHM 1% 1/4W 1206", Device Package="1206 (3216 Metric)", Manufacturer="Stackpole Electronics Inc", Operating Temperature="-55°C ~ 155°C", Power (Watts)="0.25W, 1/4W", Ratings=AEC-Q200, Supplier Device Package=1206, Supplier Part Number 1=RMCF1206FT2R20CT-ND, Temperature Coefficient=±200ppm/°C, Tolerance=±1%, ComponentLink1Description=Datasheet, ComponentLink1URL=https://www.seielect.com/catalog/sei-rmcf_rmcp.pdf, ComponentLink2Description="DigiKey Link", ComponentLink2URL=https://www.digikey.com/en/products/detail/stackpole-electronics-inc/RMCF1206FT2R20/1759711, Composition="Thick Film", Features="Automotive AEC-Q200", Height - Seated (Max)="0.028\" (0.70mm)", lastupdated="9.02.2024 20:54:28", Lifecycle Status=Active, Minimum Order=1, Number of Terminations=2, Package / Case="1206 (3216 Metric)", Packaging=TapeAndReel, Part Number=RMCF1206FT2R20, Part Status=Active, partid=30998, price=0.01, Resistance="2.2 Ohms", Series=RMCF, Size / Dimension="0.126\" L x 0.063\" W (3.20mm x 1.60mm)", Supplier 1=DigiKey
R6: library part TLRZ2BTTD, "RES 0 OHM JUMPER 1206", Device Package="1206 (3216 Metric)", Manufacturer="KOA Speer Electronics, Inc.", Operating Temperature="-55°C ~ 170°C", Ratings=AEC-Q200, Supplier Device Package=1206, Supplier Part Number 1=2019-TLRZ2BTTDCT-ND, Tolerance=Jumper, ComponentLink1Description=Datasheet, ComponentLink1URL=http://www.koaspeer.com/catimages/Products/TLRZ/TLRZ.pdf, ComponentLink2Description="DigiKey Link", ComponentLink2URL=https://www.digikey.com/en/products/detail/koa-speer-electronics-inc/TLRZ2BTTD/9845495, Composition="Metal Element", Features="Automotive AEC-Q200, Current Sense", Height - Seated (Max)="0.022\" (0.55mm)", lastupdated="9.02.2024 20:54:46", Lifecycle Status=Active, Minimum Order=1, Number of Terminations=2, Package / Case="1206 (3216 Metric)", Packaging=TapeAndReel, Part Number=TLRZ2BTTD, Part Status=Active, partid=26853, price=0.09, Resistance="0 Ohms", Series=TLRZ, Size / Dimension="0.126\" L x 0.063\" W (3.20mm x 1.60mm)", Supplier 1=DigiKey
R10 R11: library part RMCF1206FT255K, "RES 255K OHM 1% 1/4W 1206", Device Package="1206 (3216 Metric)", Manufacturer="Stackpole Electronics Inc", Operating Temperature="-55°C ~ 155°C", Power (Watts)="0.25W, 1/4W", Ratings=AEC-Q200, Supplier Device Package=1206, Supplier Part Number 1=738-RMCF1206FT255KCT-ND, Temperature Coefficient=±100ppm/°C, Tolerance=±1%, ComponentLink1Description=Datasheet, ComponentLink1URL=https://www.seielect.com/catalog/sei-rmcf_rmcp.pdf, ComponentLink2Description="DigiKey Link", ComponentLink2URL=https://www.digikey.com/en/products/detail/stackpole-electronics-inc/RMCF1206FT255K/1759971, Composition="Thick Film", Features="Automotive AEC-Q200", Height - Seated (Max)="0.028\" (0.70mm)", lastupdated="9.02.2024 20:54:42", Lifecycle Status=Active, Minimum Order=1, Number of Terminations=2, Package / Case="1206 (3216 Metric)", Packaging=TapeAndReel, Part Number=RMCF1206FT255K, Part Status=Active, partid=27366, price=0.01, Resistance="255 kOhms", Series=RMCF, Size / Dimension="0.126\" L x 0.063\" W (3.20mm x 1.60mm)", Supplier 1=DigiKey
R12: library part CRGCQ1206F820R, "RES 820 OHM 1% 1/4W 1206", Device Package="1206 (3216 Metric)", Manufacturer="TE Connectivity Passive Product", Operating Temperature="-55°C ~ 155°C", Power (Watts)="0.25W, 1/4W", Ratings=AEC-Q200, Supplier Device Package=1206, Supplier Part Number 1=A129809CT-ND, Temperature Coefficient=±100ppm/°C, Tolerance=±1%, ComponentLink1Description=Datasheet, ComponentLink1URL=https://www.te.com/commerce/DocumentDelivery/DDEController?Action=srchrtrv&DocNm=1773204-3&DocType=DS&DocLang=English, ComponentLink2Description="DigiKey Link", ComponentLink2URL=https://www.digikey.com/en/products/detail/te-connectivity-passive-product/CRGCQ1206F820R/8576411, Composition="Thick Film", Features="Automotive AEC-Q200, Moisture Resistant", Height - Seated (Max)="0.026\" (0.65mm)", lastupdated="9.02.2024 20:54:44", Lifecycle Status=Active, Minimum Order=1, Number of Terminations=2, Package / Case="1206 (3216 Metric)", Packaging=TapeAndReel, Part Number=CRGCQ1206F820R, Part Status=Active, partid=26992, price=0.01, Resistance="820 Ohms", Series=CRGCQ, Size / Dimension="0.122\" L x 0.061\" W (3.10mm x 1.55mm)", Supplier 1=DigiKey
RT1: library part MF72-010D5, "Thermistor", Manufacturer_Name=Cantherm, Datasheet Link=https://www.cantherm.com/wp-content/uploads/2018/08/MF72_AUG_2018.pdf, Height=11mm, Manufacturer_Part_Number=MF72-010D5
RV1: library part MOV-10D561KTR, "Varistor", Manufacturer_Name=Bourns, Mouser Part Number=652-MOV-10D561KTR, Arrow Part Number=MOV-10D561KTR, Arrow Price/Stock=https://www.arrow.com/en/products/mov-10d561ktr/bourns?utm_currency=USD&region=nac, Datasheet Link=https://www.bourns.com/docs/Product-Datasheets/MOV10D.pdf, Height=15.5mm, Manufacturer_Part_Number=MOV-10D561KTR, Mouser Price/Stock=https://www.mouser.co.uk/ProductDetail/Bourns/MOV-10D561KTR?qs=lgttKnAd%252B2CzitieoxdOpg%3D%3D
U1: library part 0PTF0078P, "Undefined or Miscellaneous", Manufacturer_Name=LITTELFUSE, Mouser Part Number=576-0PTF0078P, Arrow Part Number=0PTF0078P, Arrow Price/Stock=https://www.arrow.com/en/products/0ptf0078p/littelfuse?utm_currency=USD&region=europe, Datasheet Link=https://media.digikey.com/pdf/Data%20Sheets/Littelfuse%20PDFs/PTF075_77_78.pdf, Height=11.5mm, Manufacturer_Part_Number=0PTF0078P, Mouser Price/Stock=https://www.mouser.co.uk/ProductDetail/Littelfuse/0PTF0078P?qs=Co4VkB5J4%2Fsczy6gG8s%2FsA%3D%3D
U2: library part ZC323000, "STM32F103C8T6 ARM STM32 Minimum System Development Board Module For Arduino", Package=None, Availability=Unavailable, MP=ZC323000, price=None
U3: "No Description Available", Mfr_Name="Analog Devices Inc", RefDes=RefDes, Type=Type
VR1: library part 3314J-2-103E, "Variable Resistor", Manufacturer_Name=Bourns, Mouser Part Number=652-3314J-2-103E, Arrow Part Number=3314J-2-103E, Arrow Price/Stock=https://www.arrow.com/en/products/3314j-2-103e/bourns?region=europe, Datasheet Link=https://componentsearchengine.com/Datasheets/1/3314J-2-102E.pdf, Height=2.55mm, Manufacturer_Part_Number=3314J-2-103E, Mouser Price/Stock=https://www.mouser.co.uk/ProductDetail/Bourns/3314J-2-103E?qs=eZFUMUGMTB7dPQMBqmZxfA%3D%3D
Y1: library part 9C-3.579545MAAJ-T, "CRYSTAL 3.579545MHZ 18PF SMD", ESR (Equivalent Series Resistance)="200 Ohms", Frequency Stability=±30ppm, Load Capacitance=18pF, Manufacturer="TXC CORPORATION", Operating Mode=Fundamental, Operating Temperature="-20°C ~ 70°C", Package / Case=HC-49/US, Supplier Part Number 1=887-1040-1-ND, ComponentLink1Description=Datasheet, ComponentLink1URL=http://www.txccorp.com/download/products/quartz_crystals/2015TXC_9C_32.pdf, ComponentLink2Description="DigiKey Link", ComponentLink2URL=http://digikey.com/product-detail/en/txc-corporation/9C-3.579545MAAJ-T/887-1040-1-ND/2118917, Frequency=3.579545MHz, Frequency Tolerance=±30ppm, Height - Seated (Max)="0.161\" (4.10mm)", lastupdated="3.06.2024 20:02:24", Lifecycle Status=Active, Minimum Order=1, Mounting Type="Surface Mount", Packaging=TapeAndReel, Part Number=9C-3.579545MAAJ-T, Part Status=Active, partid=711, price=0.22, Series=9C, Size / Dimension="0.449\" L x 0.189\" W (11.40mm x 4.80mm)", Supplier 1=DigiKey, Type="MHz Crystal"

## Via types
v1: diameter 1.27, hole 0.711, Top Layer to Bottom Layer, 9 vias

## Nets (pads, with @x,y where several pads share a name; then routed paths per layer and width w, separated by ;. In a path a pad name is that pad's centre, name@x,y a point inside that pad or via, vN(x,y) a via of type N, cw(c..) or ccw(c..) an arc to the next point about the centre after c; other vN are vias at no path point)
ACOUT-1: FL1.4 PS1.1 | length 16
  Top Layer w1.5: FL1.4 92.1,51.9 94.8,49.2 PS1.1
ACOUT-2: FL1.3 PS1.2 | length 18.5
  Top Layer w1.5: FL1.3 82.4,51.8 82.4,42.2 85.8,38.8 PS1.2
AVDD: C6.1 C7.2 R1.1 U3.3 | length 15.9
  Top Layer w0.5: C6.1 31.05,80.5 ccw(c31.45,80.5) 31.053,80.45 C7.2 31.004,80.446 31.15,80.3 31.7,80.3 cw(c31.7,79.052) 32.582,79.935 cw(c32.044,79.397) 32.805,79.397 ccw(c34.6,79.395) 32.805,79.375 ccw(c34.6,79.395) R1.1 34.71,77.6 35.06,77.25 35.06,72.7 U3.3
CLKIN: C13.1 U3.15 Y1.1 | length 12.6
  Bottom Layer w0.6: Y1.1 24.9,55.2 26.7,57 C13.1 ; C13.1@26.7,61.05 26.7,64.18 U3.15
CLKOUT: C11.1 U3.16 Y1.2 | length 12.3
  Bottom Layer w0.6: U3.16 30.06,64.75 29.6,64.29 29.6,60.9 29.6,56.5 30.9,55.2 Y1.2
DVDD: C3.1 C4.2 C5.2 C8.2 C9.1 J3.2 L1.2 R1.2 R4.1 R9.2 U2.38 U3.2 VR1.3 | length 188
  Top Layer w0.5: J3.2 14.04,15.34 13.1,14.4 13.1,4.2 15.8,1.5 20.2,1.5 21.5,2.8 VR1.3 R4.1 ; R1.2 C8.2 42,80.4 ; v1(41.1,78.4) 41.1,79.5 42,80.4 ; C5.2 C4.2 48.675,80.425 45.225,80.425 R9.2 42.5,80.4 42,80.4
  Top Layer w1: R4.1 44.6,4.4 50.1,9.9 56,9.9 ; C5.2 52.625,80.425 55.675,80.425 v1(55.7,80.4) ; v1(55.7,59.8) 55.7,39.4 48.9,32.6 U2.38 48.9,17 56,9.9 ; L1.2 67.3,12 65.2,9.9 C3.1 56,9.9
  Bottom Layer w0.5: U3.2 37.68,78.37 C9.1 v1(41.1,78.4)
  Bottom Layer w1: v1(55.7,59.8) v1(55.7,80.4)
GND: C2.2 C3.2 C4.1 C5.1 C6.2 C7.1 C8.1 C9.2 C10.1 C11.2 C12.1 C13.2 C14.1 C15.1 C16.2 C17.1 D1.2 J3.1 J3.5 J3.16 PS1.3 R2.1 R6.2 R13.1 U2.19 U3.8 U3.10 VR1.1
NetC1_1: C1.1 FL1.2 J1.2 RV1.1 | length 53.8
  Top Layer w1.5: FL1.2 79.4,58.9 76.4,61.9 C1.1 78.4,77 80.6,79.2 RV1.1 80.6,93.8 87,100.2 J1.2
NetC1_2: C1.2 RT1.1 RV1.2 U1.2 | length 30.6
  Top Layer w1.5: RV1.2 86.4,84.1 C1.2 86.4,71.9 RT1.1 95.8,68.7 U1.2
NetC2_1: C2.1 L1.1 PS1.4 | length 29.6
  Top Layer w1: L1.1 78.8,7.3 80.9,9.4 PS1.4 84.6,17.5 82,20.1 C2.1
NetC16_1: C16.1 C17.2 U3.9 | length 8.5
  Top Layer w0.5: C16.1 C17.2 U3.9
NetD1_1: D1.1 R12.2 | length 3.4
  Top Layer w0.6: R12.2 D1.1
NetFB1_1: FB1.1 J1.3 U1.1 | length 55
  Top Layer w1: v1(71.1,71.7) 71.15,71.65 FB1.1
  Top Layer w1.5: J1.3 97.42,94.18 99.5,92.1 U1.1
  Bottom Layer w1: v1(71.1,71.7) 90.1,71.7 99.5,81.1 U1.1
NetFB1_2: FB1.2 R10.1 | length 3.3
  Top Layer w1: FB1.2 66.875,68.975 66.875,65.725 R10.1
NetFL1_1: FL1.1 RT1.2 | length 14.6
  Top Layer w1.5: RT1.2 84.6,60.4 86.1,58.9 FL1.1
NetJ2_1: J2.1 R7.2 R8.1 | length 16.9
  Bottom Layer w0.6: J2.1 J2.1@35.9,100.8 ; R7.2 R8.1
  Bottom Layer w1: R7.2 J2.1@35.9,100.8
NetJ2_2: J2.2 R3.1 R5.1 | length 18.3
  Bottom Layer w0.6: R3.1 28.18,88.1 28.19,88.11 R5.1 ; J2.2 J2.2@28.19,100.89
  Bottom Layer w1: R5.1@28.19,88.11 J2.2@28.19,100.89
NetJ3_3: J3.3 VR1.2 | length 7.5
  Top Layer w0.5: VR1.2 18.12,6.17 J3.3
NetJ3_4: J3.4 U2.21 | length 21.7
  Top Layer w0.5: U2.21 5.72,23.68 10,19.4 16.2,19.4 18.12,17.48 J3.4
NetJ3_6: J3.6 U2.22 | length 22
  Top Layer w0.5: U2.22 8.26,23.74 11,21 17.62,21 20.66,17.96 J3.6
NetJ3_11: J3.11 U2.23 | length 38.3
  Top Layer w0.5: v1(28.28,8.28) J3.11
  Bottom Layer w0.5: U2.23 10.8,14.7 17.22,8.28 v1(28.28,8.28)
NetJ3_12: J3.12 U2.24 | length 24.3
  Top Layer w0.5: U2.24 13.34,25.36 16.3,22.4 25.1,22.4 28.28,19.22 J3.12
NetJ3_13: J3.13 U2.36 | length 26.4
  Top Layer w0.5: J3.13 32.02,14 41.5,14 43.8,16.3 v1(43.8,19.8)
  Bottom Layer w0.5: v1(43.8,19.8) 43.81,19.81 43.81,28.29 U2.36
NetJ3_14: J3.14 U2.37 | length 25.9
  Top Layer w0.5: J3.14 30.82,19.42 33.7,22.3 44.8,22.3 46.36,23.86 U2.37
NetJ3_15: J3.15 R4.2 | length 5.6
  Top Layer w0.6: R4.2 33.33,7.23 33.33,12.77 J3.15
NetR5_2: R5.2 R6.1 R7.1 | length 11
  Bottom Layer w0.6: R5.2 R7.1 R6.1
NetR9_1: R9.1 U2.25 U3.1 | length 78.5
  Top Layer w0.5: U2.25 15.88,33.38 20.6,38.1 41.2,38.1 45.1,42 45.1,60.8 v1(45.2,60.9) ; U3.1 40.24,72.6 v1(45.2,72.6) R9.1
  Bottom Layer w0.5: v1(45.2,60.9) v1(45.2,72.6)
NetR10_2: R10.2 R11.1 | length 3.2
  Top Layer w1: R11.1 R10.2
NetR12_1: R12.1 U3.11 | length 4.2
  Top Layer w0.6: R12.1 17.33,60.83 17.33,64.97 U3.11
NetU2_10: U2.10 U3.19 | length 24.2
  Top Layer w0.6: U2.10 31.12,50.58 37.68,57.14 U3.19
NetU2_11: U2.11 U3.18 | length 24.3
  Top Layer w0.6: U2.11 28.406,43.714 28.406,44.339 28.4,44.345 28.4,50.6 35.14,57.34 U3.18
NetU2_12: U2.12 U3.20 | length 33
  Top Layer w0.6: v1(26,49.4) 26.04,49.36 U2.12
  Bottom Layer w0.6: v1(26,49.4) 35.7,49.4 40.22,53.92 U3.20
NetU2_13: U2.13 U3.17 | length 25.2
  Top Layer w0.6: U2.13 23.5,49.1 32.6,58.2 U3.17
NetU2_14: U2.14 U3.14 | length 23.1
  Top Layer w0.6: U2.14 20.96,48.86 24.98,52.88 U3.14
V1N: C14.2 R8.2 U3.5 | length 32.5
  Bottom Layer w0.5: U3.5 30.06,70.74 31.2,69.6 41,69.6 42.8,71.4 C14.2
  Bottom Layer w0.6: C14.2 R8.2
V1P: C12.2 R3.2 U3.4 | length 19.1
  Bottom Layer w0.5: C12.2 26.65,82.65 32.6,76.7 U3.4
  Bottom Layer w0.6: C12.2 R3.2
V2N: C10.2 R2.2 U3.6 | length 8.2
  Top Layer w0.5: C10.2 24.325,77.475 R2.2@27.575,77.475 ; U3.6 27.52,77.42 R2.2@27.575,77.475 ; R2.2 R2.2@27.575,77.475
V2P: C15.2 R11.2 R13.2 U3.7 | length 54.9
  Top Layer w1: U3.7 24.98,69.62 27.09,67.51 44.19,67.51 49.2,62.5 R11.2 R13.2 66.875,59.075 66.875,55.525 C15.2
pads on no net: J1.1 J3.7 J3.8 J3.9 J3.10 U2.1 U2.2 U2.3 U2.4 U2.5 U2.6 U2.7 U2.8 U2.9 U2.15 U2.16 U2.17 U2.18 U2.20 U2.26 U2.27 U2.28 U2.29 U2.30 U2.31 U2.32 U2.33 U2.34 U2.35 U2.39 U2.40 U3.12 U3.13

## Polygon pours and split planes (outlines as drawn)
GND on Top Layer "GND_L01_P001" (solid, remove dead copper, pour order 1): 11.3,91.8 ccw(c11.3,85.8) 5.3,85.8 5.3,7 ccw(c11.3,7) 11.3,1 97.9,1 ccw(c97.9,7) 103.9,7 103.9,20.5 ccw(c97.9,20.5) 97.9,26.5 63.7,26.5 cw(c63.7,32.5) 57.7,32.5 57.7,85.8 ccw(c51.7,85.8) 51.7,91.8
GND on Bottom Layer "NONET_L-01_P-001" (solid, remove dead copper, pour order 0): 11.3,91.8 ccw(c11.3,85.8) 5.3,85.8 5.3,7 ccw(c11.3,7) 11.3,1 97.9,1 ccw(c97.9,7) 103.9,7 103.9,20.5 ccw(c97.9,20.5) 97.9,26.5 63.7,26.5 cw(c63.7,32.5) 57.7,32.5 57.7,85.8 ccw(c51.7,85.8) 51.7,91.8

## Silkscreen, mask and mechanical layers (free items; w line width, h text height)
Top Overlay:
  text "PE" at 80,108.8 h5
  text "N" at 88.8,108.8 h5
  text "L" at 96.7,108.8 h5
  text "CT" at 28.873,108.642 h5
  text "e" at 63.7,93.9 h13
  text "W" at 63.7,34.5 h13
Bottom Overlay:
  text "H" at 46,51.1 h25
  text "AC Power Meter VERSION 1.0" at 102,21.033 h3
  text "Hardware Designed by Yunus Kellegöz" at 101.9,18.776 h2
  text "08.05.2025" at 102,16.122 h2
Mechanical 13:
  circle w0.254: c106.8,112 r1.5
  circle w0.254: c55,112 r1.5
  circle w0.254: c107.093,2.819 r1.5
  circle w0.254: c55.593,3.019 r1.5
  circle w0.254: c2.5,3.1 r1.5
  circle w0.254: c3,112 r1.5
  pour cut-out: 106.8,110.5 cw(c106.8,112) 105.3,112 cw(c106.8,112) 106.8,113.5 cw(c106.8,112) 108.3,112 cw(c106.8,112)
  pour cut-out: 55,110.5 cw(c55,112) 53.5,112 cw(c55,112) 55,113.5 cw(c55,112) 56.5,112 cw(c55,112)
  pour cut-out: 107.093,1.319 cw(c107.093,2.819) 105.593,2.819 cw(c107.093,2.819) 107.093,4.319 cw(c107.093,2.819) 108.593,2.819 cw(c107.093,2.819)
  pour cut-out: 55.593,1.519 cw(c55.593,3.019) 54.093,3.019 cw(c55.593,3.019) 55.593,4.519 cw(c55.593,3.019) 57.093,3.019 cw(c55.593,3.019)
  pour cut-out: 2.5,1.6 cw(c2.5,3.1) 1,3.1 cw(c2.5,3.1) 2.5,4.6 cw(c2.5,3.1) 4,3.1 cw(c2.5,3.1)
  pour cut-out: 3,110.5 cw(c3,112) 1.5,112 cw(c3,112) 3,113.5 cw(c3,112) 4.5,112 cw(c3,112)

## Text inside footprints (layer, text, board x,y; h text height)
U3: Top Overlay "*" at 41.109,72.938 h1.27 r270; Mechanical 13 "*" at 39.585,72.43 h1.27 r270